# EAGLE board estacao_meteorologica (EAGLE 9.7.0)

Size 159.64 x 59.69 mm. Coordinates in mm from the lower left corner, seen from the top.
Outline: 0,0 159.64,0 159.64,59.69 0,59.69 0,0
Copper layers (1*16): Top 0.035mm / dielectric 1.5mm / Bottom 0.035mm
Design rules "default": minimum track width 6mil, minimum drill 0.35mm, track to track 6mil, track to pad 6mil, pad to pad 6mil, via to via 6mil, smd to smd 6mil, copper to edge 40mil, drill to drill 6mil, minimum pad ring 10mil, minimum via ring 8mil, stop-mask expansion 4mil, vias tented up to drill 0mil, thermal gap 10mil

## Footprints (pad centres in the part's own frame; a part is rotated, then mirrored left to right if it is on the bottom)
LEDRD254W60D565H860B = drill 0.981 pad 1.581: 1 -1.27,0; 2 1.27,0
PIEZO = drill 1 pad 1.6: 1 -3.5,0; 2 3.5,0
RESAD1016W63L850D250B = drill 0.83 pad 1.43: 1 -5.08,0; 2 5.08,0
GL5528 = drill 0.8 pad 1.4: 1 -1.702,0; 2 1.702,0
HA-06-SM065 = drill 1 pad 1.676: 1 -2.54,-2.54; 2 0,2.54; 3 2.54,-2.54
SWITCH-MOMENTARY-PTH-6.5MM = drill 1.016 pad 1.88: 1 -3.251,2.261; 2 3.251,2.261; 3 -3.251,-2.261; 4 3.251,-2.261
ARDUINO-UNO-R3-SHIELD = drill 1.016 pad 1.88: 3.3V 24.13,-2.54; 5V 24.13,0; A0 24.13,12.7; A1 24.13,15.24; A2 24.13,17.78; A3 24.13,20.32; A4 24.13,22.86; A5 24.13,25.4; AREF -24.13,-13.97; D2 -24.13,20.32; D3 -24.13,17.78; D4 -24.13,15.24; D5 -24.13,12.7; D6 -24.13,10.16; D7 -24.13,7.62; D8 -24.13,3.81; D9 -24.13,1.27; D10 -24.13,-1.27; D11 -24.13,-3.81; D12 -24.13,-6.35; D13 -24.13,-8.89; GND@0 24.13,2.54; GND@1 24.13,5.08; GND@2 -24.13,-11.43; IOREF 24.13,-7.62; NC 24.13,-10.16; RES 24.13,-5.08; RX -24.13,25.4; SCL -24.13,-19.05; SDA -24.13,-16.51; TX -24.13,22.86; VIN 24.13,7.62
TO92 = drill 0.813 octagon: 1 -1.27,0; 2 0,1.905; 3 1.27,0

## Placement (x,y rotation side)
D1  RED  [LEDRD254W60D565H860B]  121.05,43.38 180 top
PIEZO1  PIEZO  [PIEZO]  93.11,43.38 0 top
R1  330  [RESAD1016W63L850D250B]  127.4,40.84 0 top
RLDR  PHOTOCELL_GL5528  [GL5528]  154.07,40.84 0 top
RPOTCHUVA  10k  [HA-06-SM065]  147.72,17.98 0 top
RPOTPRESSÃO  10k  [HA-06-SM065]  117.24,17.98 0 top
RPOTQUALIDADE_DO_AR  10k  [HA-06-SM065]  132.48,17.98 0 top
RPOTUMIDADE4  10k  [HA-06-SM065]  102,17.98 0 top
RRESISTOR_10K  10k  [RESAD1016W63L850D250B]  150.26,35.76 0 top
SBOTÃO  SWITCH_MOMENTARY  [SWITCH-MOMENTARY-PTH-6.5MM]  109.62,37.03 90 top
U1  ARDUINO-UNO-R3-SHIELD  [ARDUINO-UNO-R3-SHIELD]  47.88,29.84 270 top
U2  TMP36GT9Z_TO92  [TO92]  91.84,17.98 0 top

## Library data of the parts
D1 = Tinkercad; CATEGORY: Opto-Electronic; SUB-CATEGORY: LED; VALUE: LED_RED
PIEZO1 R1 RLDR RPOTCHUVA RPOTPRESSÃO RPOTQUALIDADE_DO_AR RPOTUMIDADE4 RRESISTOR_10K SBOTÃO U1 U2 = Tinkercad

## Nets
D1_A: D1.1 R1.1
U1_5V: RPOTCHUVA.1 RPOTPRESSÃO.1 RPOTQUALIDADE_DO_AR.1 RPOTUMIDADE4.1 U1.5V U2.3
U1_A0: U1.A0 U2.2
U1_A1: RPOTUMIDADE4.2 U1.A1
U1_A2: RPOTPRESSÃO.2 U1.A2
U1_A3: RPOTQUALIDADE_DO_AR.2 U1.A3
U1_A4: RPOTCHUVA.2 U1.A4
U1_A5: RLDR.2 RRESISTOR_10K.2 U1.A5
U1_D2: SBOTÃO.1 SBOTÃO.2 U1.D2
U1_D8: R1.2 U1.D8
U1_D9: PIEZO1.1 U1.D9
U1_GND: D1.2 PIEZO1.2 RLDR.1 RPOTCHUVA.3 RPOTPRESSÃO.3 RPOTQUALIDADE_DO_AR.3 RPOTUMIDADE4.3 RRESISTOR_10K.1 SBOTÃO.3 SBOTÃO.4 U1.GND@0 U1.GND@1 U1.GND@2 U2.1

## Tracks (layer width: path | path; a pad name or v marks a point on that pad's centre or on a via)
D1_A  (1 unrouted)
U1_5V  (5 unrouted)
U1_A0  (1 unrouted)
U1_A1  (1 unrouted)
U1_A2  (1 unrouted)
U1_A3  (1 unrouted)
U1_A4  (1 unrouted)
U1_A5  (2 unrouted)
U1_D2  (2 unrouted)
U1_D8  (1 unrouted)
U1_D9  (1 unrouted)
U1_GND  (13 unrouted)